# Altium PCB PCB_V1.0.PcbDoc
Units mil, origin at the board's own origin, x right, y up, seen from the top; angles counter-clockwise.
Board outline 6000 x 4000 mil, 2 copper layers (Top Layer, Bottom Layer); 41 components, 47 nets, 166 pads, 8 vias.
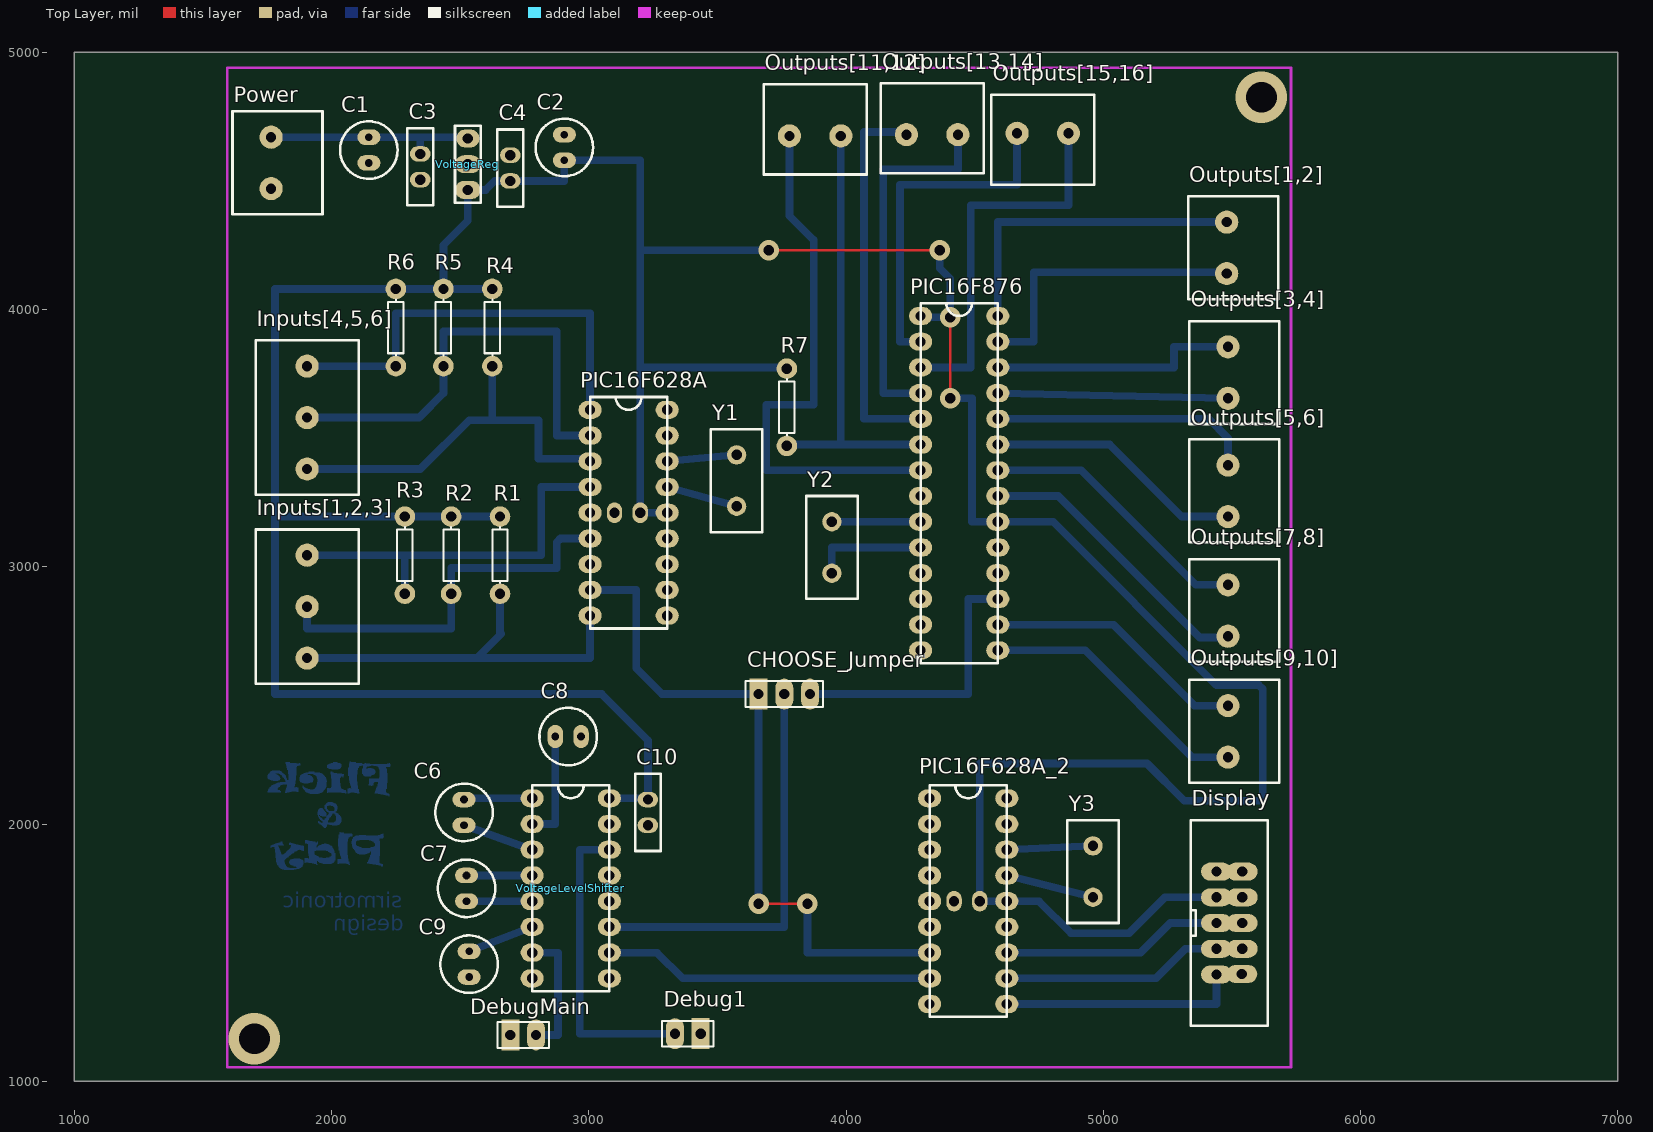
[diagram p0: Top Layer view]
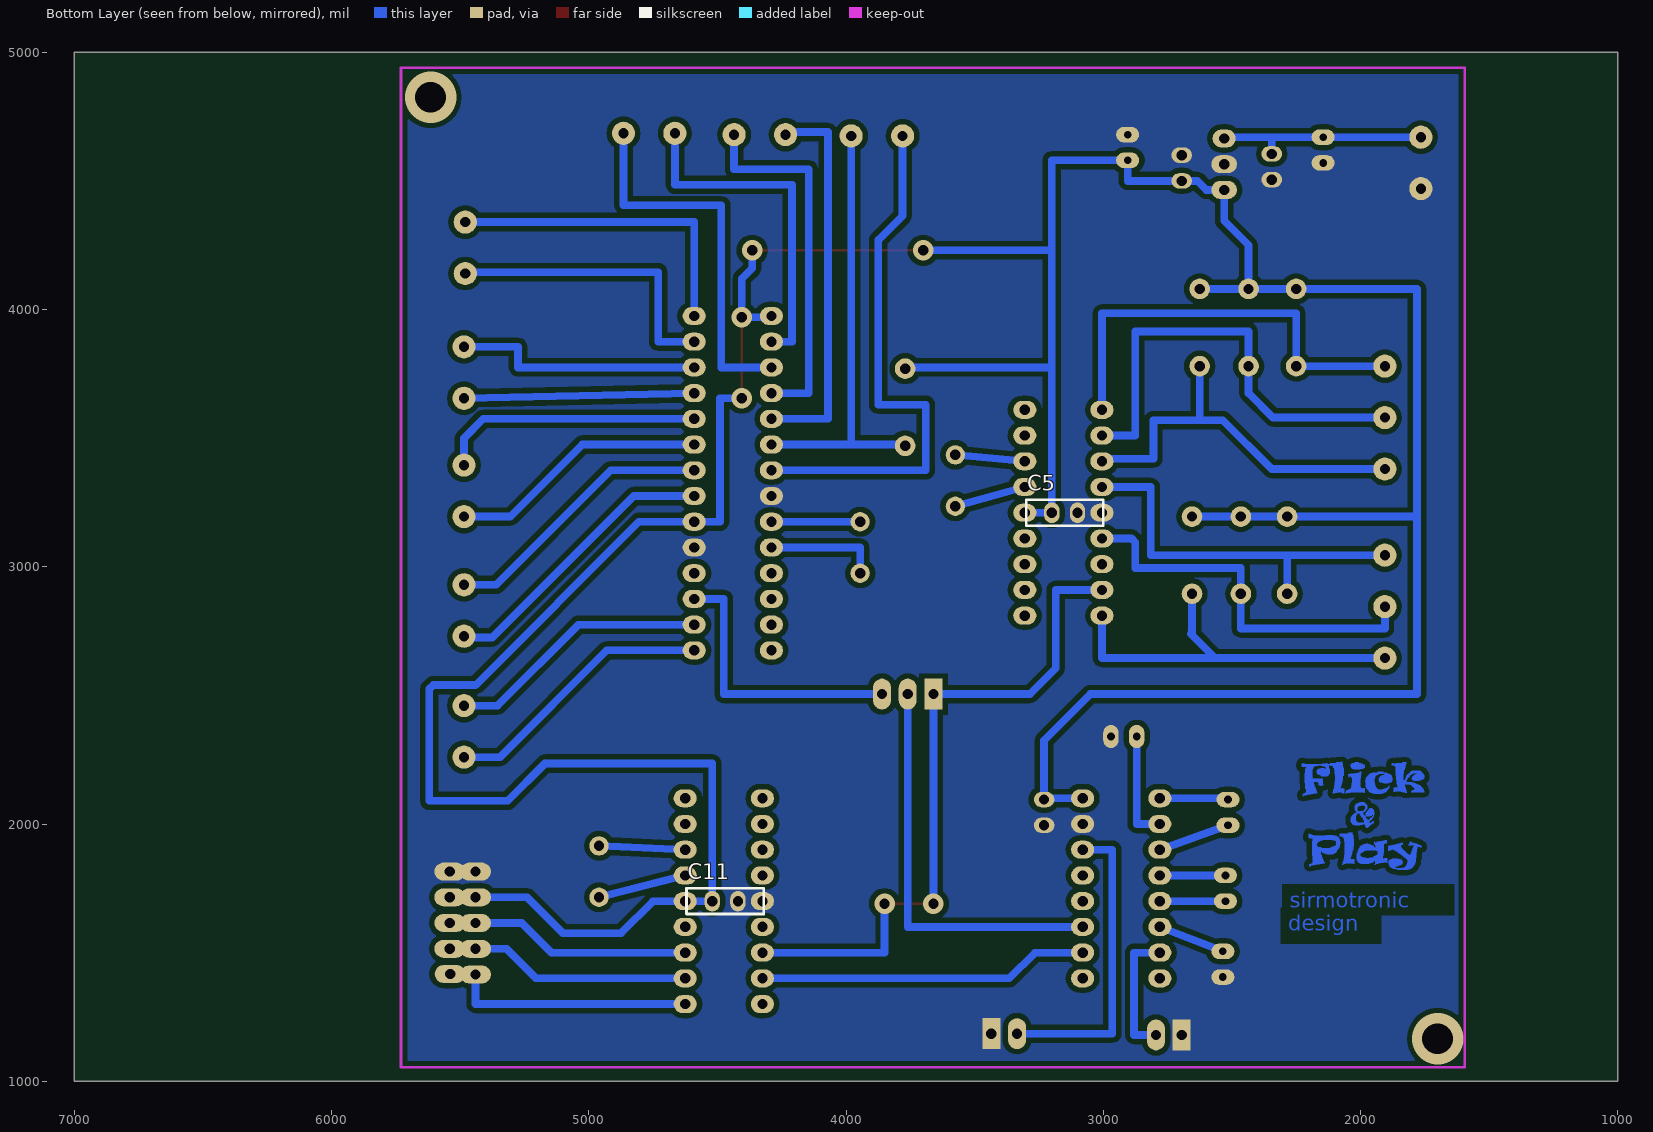
[diagram p1: Bottom Layer view, seen from below]

## Layer stack, top to bottom
Top Layer: signal copper 1.4
Dielectric: dielectric 12.6, FR-4, Dk 4.8
Bottom Layer: signal copper 1.4

## Board outline
1000,1000 7000,1000 7000,5000 1000,5000

## Design rules (kind name [scope] priority, off if disabled: settings)
Clearance [All] p1: gap=20
PolygonConnect [All] p1: connectstyle=Direct reliefconductorwidth=10 reliefentries=4 polygonreliefangle="90 Angle" airgapwidth=10
RoutingVias [All] p1: holewidth=28 width=50 viastyle="Through Hole" minholewidth=28 minwidth=50 maxholewidth=28 maxwidth=50
SolderMaskExpansion [All] p1: expansion=4
Width [All] p1: maxlimit=80 minlimit=10 preferedwidth=50 toplayer_maxwidth=10 toplayer_prefwidth=10 bottomlayer_minwidth=30 minimp=50.000000 maximp=50.000000 favimp=50.000000
28 further rules are at their usual default settings.

## Classes and differential pairs
component class DebugPart: C6 C7 C8 C9 C10 CHOOSE_Jumper Debug1 DebugMain VoltageLevelShifter
component class Inputs: C5 Inputs[1,2,3] Inputs[4,5,6] PIC16F628A R1 R2 R3 R4 R5 R6 Y1
component class MainGame: C11 Display PIC16F628A_2 Y3
component class Outputs: Outputs[1,2] Outputs[3,4] Outputs[5,6] Outputs[7,8] Outputs[9,10] Outputs[11,12] Outputs[13,14] Outputs[15,16] PIC16F876 R7 Y2
component class PowerSupply: C1 C2 C3 C4 Power VoltageReg

## Components (designator, comment, footprint, x,y, rotation, side; value= is the part's Value field where it differs from the comment)
C1 "Cap Pol1" Electrolytic_Capacitor 2145,4620 r270 top
C2 "Cap Pol1" Electrolytic_Capacitor 2905,4630 r90 top
C3 "Cap" CeramicalCapacitor 2345,4555 r90 top
C4 "Cap" CeramicalCapacitor 2695,4550 r270 top
C5 "Cap" CeramicalCapacitor 3150,3210 r0 bottom
C6 "Cap Pol1" Electrolytic_Capacitor 2515,2045 r270 top
C7 "Cap Pol1" Electrolytic_Capacitor 2525,1750 r270 top
C8 "Cap Pol1" Electrolytic_Capacitor 2920,2340 r0 top
C9 "Cap Pol1" Electrolytic_Capacitor 2535,1455 r90 top
C10 "Cap" CeramicalCapacitor 3230,2045 r270 top
C11 "Cap" CeramicalCapacitor 4470,1700 r180 bottom
CHOOSE_Jumper "Header 3" HDR1X3 3660,2505 r0 top
Debug1 "Header 2" HDR1X2 3435,1185 r180 top
DebugMain "Header 2" HDR1X2 2695,1180 r0 top
Display "Header 5X2" DisplayConnector 5490,1615 r180 top
Inputs[1,2,3] "klema" klema3 1905,2845 r180 top
Inputs[4,5,6] "klema" klema3 1905,3580 r180 top
Outputs[1,2] "Klema" Klema 5480,4240 r270 top
Outputs[3,4] "Klema" Klema 5485,3755 r270 top
Outputs[5,6] "Klema" Klema 5485,3295 r270 top
Outputs[7,8] "Klema" Klema 5485,2830 r270 top
Outputs[9,10] "Klema" Klema 5485,2360 r270 top
Outputs[11,12] "Klema" Klema 3880,4675 r0 top
Outputs[13,14] "Klema" Klema 4335,4680 r0 top
Outputs[15,16] "Klema" Klema 4765,4685 r180 top
PIC16F628A "Microcontroller" DIP18 3155,3160 r0 top
PIC16F628A_2 "Microcontroller" DIP18 4475,1650 r0 top
PIC16F876 "ucu" DIP28 4440,3375 r0 top
Power "Klema" Klema 1765,4570 r270 top
R1 "Res1" AXIAL-0.3 2655,3045 r90 top
R2 "Res1" AXIAL-0.3 2465,3045 r90 top
R3 "Res1" AXIAL-0.3 2285,3045 r90 top
R4 "Res1" AXIAL-0.3 2625,3930 r90 top
R5 "Res1" AXIAL-0.3 2435,3930 r90 top
R6 "Res1" AXIAL-0.3 2250,3930 r90 top
R7 "Res1" AXIAL-0.3 3770,3620 r90 top
VoltageLevelShifter "MAX232" DIP16 2930,1850 r0 top
VoltageReg "LM7805" LM7805 2530,4565 r270 top
Y1 "XTAL" Kristal 3575,3335 r270 top
Y2 "XTAL" Kristal 3945,3075 r90 top
Y3 "XTAL" Kristal 4960,1815 r270 top

## Footprints (in the part's own frame and the unit in brackets; to place one, negate y for a bottom-side part, rotate by r counter-clockwise, add the part's x,y. Pads: shape width x height; smd on the part's side, far side on the other; paste and mask are expansions set on the pad)
AXIAL-0.3 [mil] "Axial Device, Thru-Hole; 2 Leads; 0.3 in Pin Spacing"
  round 80 hole 40: 1(-150,0) 2(150,0)
  silkscreen extent -109,-30 109,30
CeramicalCapacitor [mil]
  oval 60x80 hole 40: 1(-50,0) 2(50,0)
  silkscreen extent -150,-50 150,50
DIP16 [mil]
  oval 90x70 hole 40: 1(-150,250) 2(-150,150) 3(-150,50) 4(-150,-50) 5(-150,-150) 6(-150,-250) 7(-150,-350) 8(-150,-450) 9(150,-450) 10(150,-350) 11(150,-250) 12(150,-150) 13(150,-50) 14(150,50) 15(150,150) 16(150,250)
  silkscreen extent -150,-500 150,300
DIP18 [mil]
  oval 90x70 hole 40: 1(-150,450) 2(-150,350) 3(-150,250) 4(-150,150) 5(-150,50) 6(-150,-50) 7(-150,-150) 8(-150,-250) 9(-150,-350) 10(150,-350) 11(150,-250) 12(150,-150) 13(150,-50) 14(150,50) 15(150,150) 16(150,250) 17(150,350) 18(150,450)
  silkscreen extent -150,-400 150,500
DIP28 [mil]
  oval 90x70 hole 40: 1(-150,600) 2(-150,500) 3(-150,400) 4(-150,300) 5(-150,200) 6(-150,100) 7(-150,0) 8(-150,-100) 9(-150,-200) 10(-150,-300) 11(-150,-400) 12(-150,-500) 13(-150,-600) 14(-150,-700) 15(150,-700) 16(150,-600) 17(150,-500) 18(150,-400) 19(150,-300) 20(150,-200) 21(150,-100) 22(150,0) 23(150,100) 24(150,200) 25(150,300) 26(150,400) 27(150,500) 28(150,600)
  silkscreen extent -150,-750 150,650
DisplayConnector [mil]
  oval 120x70 hole 40: 1(-49,198) 2(50,200) 3(-50,100) 4(50,100) 5(-50,0) 6(50,0) 7(-50,-100) 8(50,-100) 9(-50,-200) 10(50,-200)
  silkscreen extent -150,-400 150,400
Electrolytic_Capacitor [mil]
  oval 60x90 hole 30: 1(-50,0) 2(50,0)
  silkscreen extent -112,-112 112,112
HDR1X2 [mil] "Connector; Header; 2 Position"
  rect 70x120 hole 40: 1(0,0)
  oval 70x120 hole 40: 2(100,0)
  silkscreen extent -50,-50 150,50
HDR1X3 [mil] "Connector; Header; 3 Position"
  rect 70x120 hole 40: 1(0,0)
  oval 70x120 hole 40: 2(100,0) 3(200,0)
  silkscreen extent -50,-50 250,50
Klema [mil]
  round 90 hole 40: 1(-100,0) 2(100,0)
  silkscreen extent -200,-150 200,200
klema3 [mil]
  round 90 hole 40: 1(0,200) 2(0,0) 3(0,-200)
  silkscreen extent -200,-300 200,300
Kristal [mil]
  round 75 hole 40: 1(-100,0) 2(100,0)
  silkscreen extent -200,-100 200,100
LM7805 [mil]
  oval 70x90 hole 40: 1(-100,0)
  oval 70x100 hole 40: 2(0,0) 3(100,0)
  silkscreen extent -150,-50 150,50

## Part data
C1 C2 C6 C7 C8 C9: "Polarized Capacitor (Radial)"
C3 C4 C5 C10 C11: "Capacitor"
CHOOSE_Jumper: "Header, 3-Pin"
Debug1 DebugMain: "Header, 2-Pin"
Display: "Header, 5-Pin, Dual row"
Inputs[1,2,3] Inputs[4,5,6]: library part klema3
PIC16F628A PIC16F628A_2: library part PIC16F628A, "Microcontroller PIC16F628A"
PIC16F876: library part PIC16F876, "PIC16F876 microcontroller"
R1 R2 R3 R4 R5 R6 R7: "Resistor"
VoltageLevelShifter: library part MAX3232
Y1 Y2 Y3: "Crystal Oscillator"

## Via types
v1: diameter 80, hole 40, Top Layer to Bottom Layer, 6 vias
v2: diameter 200, hole 120, Top Layer to Bottom Layer, 2 vias

## Nets (pads, with @x,y where several pads share a name; then routed paths per layer and width w, separated by ;. In a path a pad name is that pad's centre, name@x,y a point inside that pad or via, vN(x,y) a via of type N, cw(c..) or ccw(c..) an arc to the next point about the centre after c; other vN are vias at no path point)
5V: C2.1 C4.2 C5.2 C10.1 C11.1 Display.7 Display.8 PIC16F628A.14 PIC16F628A_2.14 PIC16F876.1 PIC16F876.20 R1.2 R2.2 R3.2 R4.2 R5.2 R6.2 R7.2 VoltageLevelShifter.16 VoltageReg.3 | length 15453.2
  Top Layer w10: v1(3700,4230) v1(4365,4230) 4370,4230 v1@4375,4235 ; v1(4405,3655) v1(4405,3970)
  Bottom Layer w30: R4.2 R5.2 ; R1.2 R2.2 R3.2 1780,3195 ; VoltageLevelShifter.16 C10.1@3230,2100 ; C10.1 C10.1@3230,2100 ; PIC16F628A.14 C5.2 3200,3770 ; v1(3700,4230) 3200,4230 ; R7.2@3775,3775 3205,3775 3200,3770 ; PIC16F876.1 4290,3970 v1(4405,3970) 4405,4120 4365,4160 v1(4365,4230) ; v1(4405,3655) 4490,3655 4490,3175 PIC16F876.20 4805,3175 5440,2540 5605,2540 5620,2525 5620,2090 5315,2090 5170,2235 4520,2235 C11.1 PIC16F628A_2.14 4750,1700 4875,1575 5100,1575 5240,1715 Display.8 ; 1780,3195 1780,4080 R6.2 R5.2 ; 1780,3195 1780,2505 3050,2505 3230,2325 C10.1@3230,2100 ; R5.2 2435,4250 2530,4345 VoltageReg.3 2600,4465 2635,4500 C4.2 2905,4500 C2.1 3200,4580 3200,4230 ; 3200,3770 3200,4230
12V: C1.1 C3.2 Power.1 VoltageReg.1 | length 834.1
  Bottom Layer w30: Power.1 C1.1 2340,4670 ; C3.2 2345,4665 2340,4670 ; VoltageReg.1 2525,4670 2340,4670
CLK: Display.1 Display.2 PIC16F628A_2.10 | length 930
  Bottom Layer w30: PIC16F628A_2.10 5440,1300 Display.2
DATA: Display.5 Display.6 PIC16F628A_2.12 | length 862.6
  Bottom Layer w30: PIC16F628A_2.12 5145,1500 5260,1615 Display.6
GND: C1.2 C2.2 C3.1 C4.1 C5.1 C8.2 C9.1 C10.2 C11.2 Debug1.1 DebugMain.1 Display.9 Display.10 PIC16F628A.5 PIC16F628A_2.5 PIC16F876.8 PIC16F876.19 Power.2 VoltageLevelShifter.15 VoltageReg.2
INPUT1: Inputs[1,2,3].1 PIC16F628A.9 R1.1 | length 1556.4
  Bottom Layer w30: 1905,2645 2565,2645 ; R1.1 2655,2745 2660,2740 2565,2645 ; PIC16F628A.9 3005,2645 2565,2645
INPUT2: Inputs[1,2,3].2 PIC16F628A.6 R2.1 | length 1526.2
  Bottom Layer w30: 1905,2845 1905,2760 2465,2760 R2.1 2465,2995 2875,2995 2875,3095 2890,3110 PIC16F628A.6
INPUT3: Inputs[1,2,3].3 PIC16F628A.4 R3.1 | length 1515
  Bottom Layer w30: 1905,3045 2285,3045 ; R3.1 2285,3045 ; PIC16F628A.4 2815,3310 2815,3045 2285,3045
INPUT4: Inputs[4,5,6].1 PIC16F628A.3 R4.1 | length 1548.7
  Bottom Layer w30: 1905,3380 2345,3380 2535,3570 2805,3570 2805,3420 3005,3420 PIC16F628A.3 ; 2625,3570 R4.1
INPUT5: Inputs[4,5,6].2 PIC16F628A.2 R5.1 | length 1784.4
  Bottom Layer w30: 1905,3580 2340,3580 2435,3675 R5.1 2435,3915 2875,3915 2875,3510 PIC16F628A.2
INPUT6: Inputs[4,5,6].3 PIC16F628A.1 R6.1 | length 1680
  Bottom Layer w30: 1905,3780 R6.1 2250,3985 3005,3985 PIC16F628A.1
INPUT_TX: CHOOSE_Jumper.1 PIC16F628A.8 PIC16F628A_2.7 | length 2661.4
  Top Layer w10: v1(3660,1690) v1@3835,1690
  Bottom Layer w30: PIC16F628A.8 3185,2910 3185,2605 3285,2505 CHOOSE_Jumper.1 v1(3660,1690) v1@3660,1685 ; v1(3850,1690) 3850,1500 PIC16F628A_2.7
LE: Display.3 Display.4 PIC16F628A_2.11 | length 862.6
  Bottom Layer w30: PIC16F628A_2.11 5205,1400 5320,1515 Display.4
MAIN_TX: PIC16F628A_2.8 VoltageLevelShifter.10 | length 1286.4
  Bottom Layer w30: VoltageLevelShifter.10 3265,1500 3365,1400 PIC16F628A_2.8
NetC6_1: C6.1 VoltageLevelShifter.1 | length 270
  Bottom Layer w30: C6.1 2515,2100 VoltageLevelShifter.1
NetC6_2: C6.2 VoltageLevelShifter.3 | length 281.5
  Bottom Layer w30: C6.2 VoltageLevelShifter.3
NetC7_1: C7.1 VoltageLevelShifter.4 | length 255
  Bottom Layer w30: C7.1 VoltageLevelShifter.4
NetC7_2: C7.2 VoltageLevelShifter.5 | length 255
  Bottom Layer w30: C7.2 VoltageLevelShifter.5
NetC8_1: C8.1 VoltageLevelShifter.2 | length 430
  Bottom Layer w30: VoltageLevelShifter.2 2870,2000 C8.1
NetC9_2: C9.2 VoltageLevelShifter.6 | length 262.8
  Bottom Layer w30: C9.2 VoltageLevelShifter.6
NetCHOOSE_Jumper_2: CHOOSE_Jumper.2 VoltageLevelShifter.11 | length 1585
  Bottom Layer w30: VoltageLevelShifter.11 3760,1600 CHOOSE_Jumper.2
NetDebug1_2: Debug1.2 VoltageLevelShifter.14 | length 1200
  Bottom Layer w30: VoltageLevelShifter.14 2965,1900 2965,1185 Debug1.2
NetDebugMain_2: DebugMain.2 VoltageLevelShifter.7 | length 505
  Bottom Layer w30: VoltageLevelShifter.7 2880,1500 2880,1180 DebugMain.2
NetPIC16F628A_2_15: PIC16F628A_2.15 Y3.2 | length 345.6
  Bottom Layer w30: PIC16F628A_2.15 Y3.2
NetPIC16F628A_2_16: PIC16F628A_2.16 Y3.1 | length 335.3
  Bottom Layer w30: PIC16F628A_2.16 Y3.1
NetPIC16F628A_15: PIC16F628A.15 Y1.2 | length 280.2
  Bottom Layer w30: PIC16F628A.15 Y1.2
NetPIC16F628A_16: PIC16F628A.16 Y1.1 | length 271.2
  Bottom Layer w30: PIC16F628A.16 Y1.1
NetPIC16F876_9: PIC16F876.9 Y2.2 | length 345
  Bottom Layer w30: Y2.2 PIC16F876.9
NetPIC16F876_10: PIC16F876.10 Y2.1 | length 445
  Bottom Layer w30: Y2.1 3945,3075 PIC16F876.10
OUTPUT1: Outputs[1,2].1 PIC16F876.28 | length 1255
  Bottom Layer w30: PIC16F876.28 4590,4340 5480,4340
OUTPUT2: Outputs[1,2].2 PIC16F876.27 | length 1165
  Bottom Layer w30: PIC16F876.27 4730,3875 4730,4145 5480,4145 5480,4140
OUTPUT3: Outputs[3,4].1 PIC16F876.26 | length 975
  Bottom Layer w30: PIC16F876.26 5275,3775 5275,3855 5485,3855
OUTPUT4: Outputs[3,4].2 PIC16F876.25 | length 895.2
  Bottom Layer w30: PIC16F876.25 5485,3655
OUTPUT5: Outputs[5,6].1 PIC16F876.24 | length 1031.1
  Bottom Layer w30: PIC16F876.24 5410,3575 5485,3500 5485,3395
OUTPUT6: Outputs[5,6].2 PIC16F876.23 | length 1011
  Bottom Layer w30: PIC16F876.23 5025,3475 5305,3195 5485,3195
OUTPUT7: Outputs[7,8].1 PIC16F876.22 | length 1079.3
  Bottom Layer w30: PIC16F876.22 4915,3375 5360,2930 5485,2930
OUTPUT8: Outputs[7,8].2 PIC16F876.21 | length 1124.9
  Bottom Layer w30: PIC16F876.21 4825,3275 5375,2725 5480,2725 5485,2730
OUTPUT9: Outputs[9,10].1 PIC16F876.16 | length 1025.5
  Bottom Layer w30: PIC16F876.16 5040,2775 5355,2460 5485,2460
OUTPUT10: Outputs[9,10].2 PIC16F876.15 | length 1066.9
  Bottom Layer w30: PIC16F876.15 4930,2675 5345,2260 5485,2260
OUTPUT11: Outputs[11,12].1 PIC16F876.7 | length 2124.4
  Bottom Layer w30: 3780,4675 3780,4365 3875,4270 3875,3630 3690,3630 3690,3375 PIC16F876.7
OUTPUT12: Outputs[11,12].2 PIC16F876.6 R7.1 | length 1720
  Bottom Layer w30: R7.1@3770,3475 3980,3475 ; 3980,4675 3980,3475 ; PIC16F876.6 3980,3475
OUTPUT13: Outputs[13,14].1 PIC16F876.5 | length 1510
  Bottom Layer w30: 4235,4680 4235,4690 4070,4690 4070,3575 PIC16F876.5
OUTPUT14: Outputs[13,14].2 PIC16F876.4 | length 1440
  Bottom Layer w30: PIC16F876.4 4145,3675 4145,4545 4435,4545 4435,4680
OUTPUT15: Outputs[15,16].1 PIC16F876.3 | length 1485
  Bottom Layer w30: PIC16F876.3 4485,3775 4485,4405 4865,4405 4865,4685
OUTPUT16: Outputs[15,16].2 PIC16F876.2 | length 1345
  Bottom Layer w30: PIC16F876.2 4210,3875 4210,4485 4665,4485 4665,4685
TX_INPUT: PIC16F876.18
TX_OUTPUT: CHOOSE_Jumper.3 PIC16F876.17 | length 1100
  Bottom Layer w30: CHOOSE_Jumper.3 4475,2505 4475,2875 PIC16F876.17
pads on no net: PIC16F628A.7 PIC16F628A.10 PIC16F628A.11 PIC16F628A.12 PIC16F628A.13 PIC16F628A.17 PIC16F628A.18 PIC16F628A_2.1 PIC16F628A_2.2 PIC16F628A_2.3 PIC16F628A_2.4 PIC16F628A_2.6 PIC16F628A_2.9 PIC16F628A_2.13 PIC16F628A_2.17 PIC16F628A_2.18 PIC16F876.11 PIC16F876.12 PIC16F876.13 PIC16F876.14 VoltageLevelShifter.8 VoltageLevelShifter.9 VoltageLevelShifter.12 VoltageLevelShifter.13
copper on no net:
  other v2: 1700,1165 5615,4825

## Polygon pours and split planes (outlines as drawn)
GND on Bottom Layer "Top Layer-No Net" (solid, remove dead copper, pour order 9): 1000,1000 7000,1000 7000,5000 1000,5000

## Keep-outs
Keep-Out Layer:
  lines w10: 1595,1055 1595,4805 1595,4940 5730,4940 5730,1055 1595,1055

## Other copper
Bottom Layer:
  region: 2022.3,2236.99 2031,2236.99 2031,2234.81 2035.35,2234.81 2035.35,2232.64 2037.52,2232.64 2037.52,2230.46 2037.52,2228.29 2037.52,2226.11 2037.52,2223.93 2037.52,2221.76 2035.35,2221.76 2035.35,2219.58 2033.17,2219.58 2033.17,2217.41 2031,2217.41 2031,2215.23 2026.65,2215.23 2026.65,2213.06 2000.54,2213.06 2000.54,2215.23 1991.84,2215.23 1991.84,2217.41 1987.49,2217.41 1987.49,2219.58 1983.14,2219.58 1983.14,2221.76 1983.14,2223.93 1983.14,2226.11 1983.14,2228.29 1985.31,2228.29 1985.31,2230.46 1989.66,2230.46 1989.66,2232.64 1994.02,2232.64 1994.02,2234.81 1998.37,2234.81 1998.37,2236.99 2007.07,2236.99 2007.07,2239.16 2022.3,2239.16
  region: 2002.72,2200 2009.24,2200 2009.24,2197.83 2020.12,2197.83 2020.12,2195.65 2039.7,2195.65 2039.7,2193.48 2048.4,2193.48 2048.4,2191.3 2048.4,2189.13 2046.23,2189.13 2046.23,2186.95 2046.23,2184.78 2046.23,2182.6 2044.05,2182.6 2044.05,2184.78 2035.35,2184.78 2035.35,2182.6 2033.17,2182.6 2033.17,2180.42 2031,2180.42 2031,2178.25 2031,2176.07 2031,2173.9 2031,2171.72 2031,2169.55 2031,2167.37 2031,2165.2 2031,2163.02 2031,2160.85 2031,2158.67 2033.17,2158.67 2033.17,2156.49 2033.17,2154.32 2033.17,2152.14 2033.17,2149.97 2033.17,2147.79 2033.17,2145.62 2035.35,2145.62 2035.35,2143.44 2035.35,2141.27 2035.35,2139.09 2037.52,2139.09 2037.52,2136.92 2037.52,2134.74 2044.05,2134.74 2044.05,2132.56 2048.4,2132.56 2048.4,2130.39 2054.93,2130.39 2054.93,2128.21 2054.93,2126.04 2057.1,2126.04 2057.1,2123.86 2057.1,2121.69 2057.1,2119.51 2052.75,2119.51 2052.75,2121.69 2039.7,2121.69 2039.7,2123.86 1985.31,2123.86 1985.31,2121.69 1983.14,2121.69 1983.14,2123.86 1983.14,2126.04 1983.14,2128.21 1983.14,2130.39 1983.14,2132.56 1983.14,2134.74 1983.14,2136.92 1983.14,2139.09 1989.66,2139.09 1989.66,2136.92 1994.02,2136.92 1994.02,2139.09 1998.37,2139.09 1998.37,2141.27 1998.37,2143.44 2000.54,2143.44 2000.54,2145.62 2000.54,2147.79 2000.54,2149.97 2000.54,2152.14 2000.54,2154.32 2000.54,2156.49 2000.54,2158.67 2000.54,2160.85 2000.54,2163.02 2000.54,2165.2 2000.54,2167.37 2000.54,2169.55 2000.54,2171.72 2000.54,2173.9 2000.54,2176.07 2000.54,2178.25 1998.37,2178.25 1998.37,2180.42 1998.37,2182.6 1998.37,2184.78 1998.37,2186.95 1998.37,2189.13 1998.37,2191.3 1998.37,2193.48 1996.19,2193.48 1996.19,2195.65 1996.19,2197.83 1996.19,2200 1996.19,2202.18 2002.72,2202.18
  region: 2033.17,1965.05 2048.4,1965.05 2048.4,1962.88 2078.86,1962.88 2078.86,1960.7 2081.03,1960.7 2081.03,1958.53 2081.03,1956.35 2081.03,1954.18 2081.03,1952 2070.16,1952 2070.16,1949.83 2067.98,1949.83 2067.98,1947.65 2065.81,1947.65 2065.81,1945.47 2065.81,1943.3 2063.63,1943.3 2063.63,1941.12 2063.63,1938.95 2063.63,1936.77 2063.63,1934.6 2063.63,1932.42 2061.45,1932.42 2061.45,1930.25 2061.45,1928.07 2061.45,1925.9 2061.45,1923.72 2061.45,1921.54 2061.45,1919.37 2061.45,1917.19 2061.45,1915.02 2061.45,1912.84 2061.45,1910.67 2061.45,1908.49 2061.45,1906.32 2061.45,1904.14 2061.45,1901.96 2061.45,1899.79 2061.45,1897.61 2061.45,1895.44 2061.45,1893.26 2061.45,1891.09 2061.45,1888.91 2061.45,1886.74 2061.45,1884.56 2061.45,1882.39 2061.45,1880.21 2061.45,1878.03 2063.63,1878.03 2063.63,1875.86 2063.63,1873.68 2063.63,1871.51 2063.63,1869.33 2063.63,1867.16 2063.63,1864.98 2065.81,1864.98 2065.81,1862.81 2065.81,1860.63 2065.81,1858.46 2065.81,1856.28 2065.81,1854.1 2067.98,1854.1 2067.98,1851.93 2067.98,1849.75 2067.98,1847.58 2067.98,1845.4 2067.98,1843.23 2070.16,1843.23 2070.16,1841.05 2067.98,1841.05 2067.98,1843.23 2065.81,1843.23 2065.81,1845.4 2059.28,1845.4 2059.28,1847.58 2028.82,1847.58 2028.82,1845.4 2024.47,1845.4 2024.47,1847.58 2024.47,1849.75 2024.47,1851.93 2024.47,1854.1 2024.47,1856.28 2024.47,1858.46 2024.47,1860.63 2024.47,1862.81 2039.7,1862.81 2039.7,1864.98 2039.7,1867.16 2037.52,1867.16 2037.52,1869.33 2037.52,1871.51 2037.52,1873.68 2035.35,1873.68 2035.35,1875.86 2035.35,1878.03 2033.17,1878.03 2033.17,1880.21 2033.17,1882.39 2033.17,1884.56 2033.17,1886.74 2031,1886.74 2031,1888.91 2031,1891.09 2031,1893.26 2031,1895.44 2031,1897.61 2028.82,1897.61 2028.82,1899.79 2028.82,1901.96 2028.82,1904.14 2028.82,1906.32 2028.82,1908.49 2028.82,1910.67 2028.82,1912.84 2026.65,1912.84 2026.65,1915.02 2026.65,1917.19 2026.65,1919.37 2026.65,1921.54 2026.65,1923.72 2026.65,1925.9 2026.65,1928.07 2026.65,1930.25 2026.65,1932.42 2026.65,1934.6 2026.65,1936.77 2026.65,1938.95 2026.65,1941.12 2026.65,1943.3 2028.82,1943.3 2028.82,1945.47 2028.82,1947.65 2028.82,1949.83 2028.82,1952 2028.82,1954.18 2028.82,1956.35 2028.82,1958.53 2031,1958.53 2031,1960.7 2031,1962.88 2031,1965.05 2031,1967.23 2033.17,1967.23
  region: 207 vertices and 0 holes, not listed, extent 1876.54,2117.34 1980.96,2202.18
  region: 245 vertices and 2 holes, not listed, extent 1946.16,1984.63 2037.52,2084.7
  region: 299 vertices and 0 holes, not listed, extent 1763.42,1821.47 1891.77,1930.25
  region: 303 vertices and 0 holes, not listed, extent 1752.54,2121.69 1878.72,2239.16
  region: 172 vertices and 1 holes, not listed, extent 1896.12,1841.05 2013.59,1936.77
  region: 180 vertices and 1 holes, not listed, extent 2078.86,1836.7 2202.86,1962.88
  region: 389 vertices and 0 holes, not listed, extent 2063.63,2108.63 2228.97,2241.34
  text "sirmotronic" at 2275,1675 h60
  text "design" at 2280,1585 h60